# Altium PCB NewTrackerBoard.PcbDoc (part 2 of 4)
Units mm, origin at the board's own origin, x right, y up, seen from the top; angles counter-clockwise.
Board outline 47 x 47 mm, 4 copper layers (L1 (SIG), L2 (GND), L3 (GND), L4 (SIG + PWR)), stack 1.566 mm thick; 77 components, 57 nets, 308 pads, 297 vias.
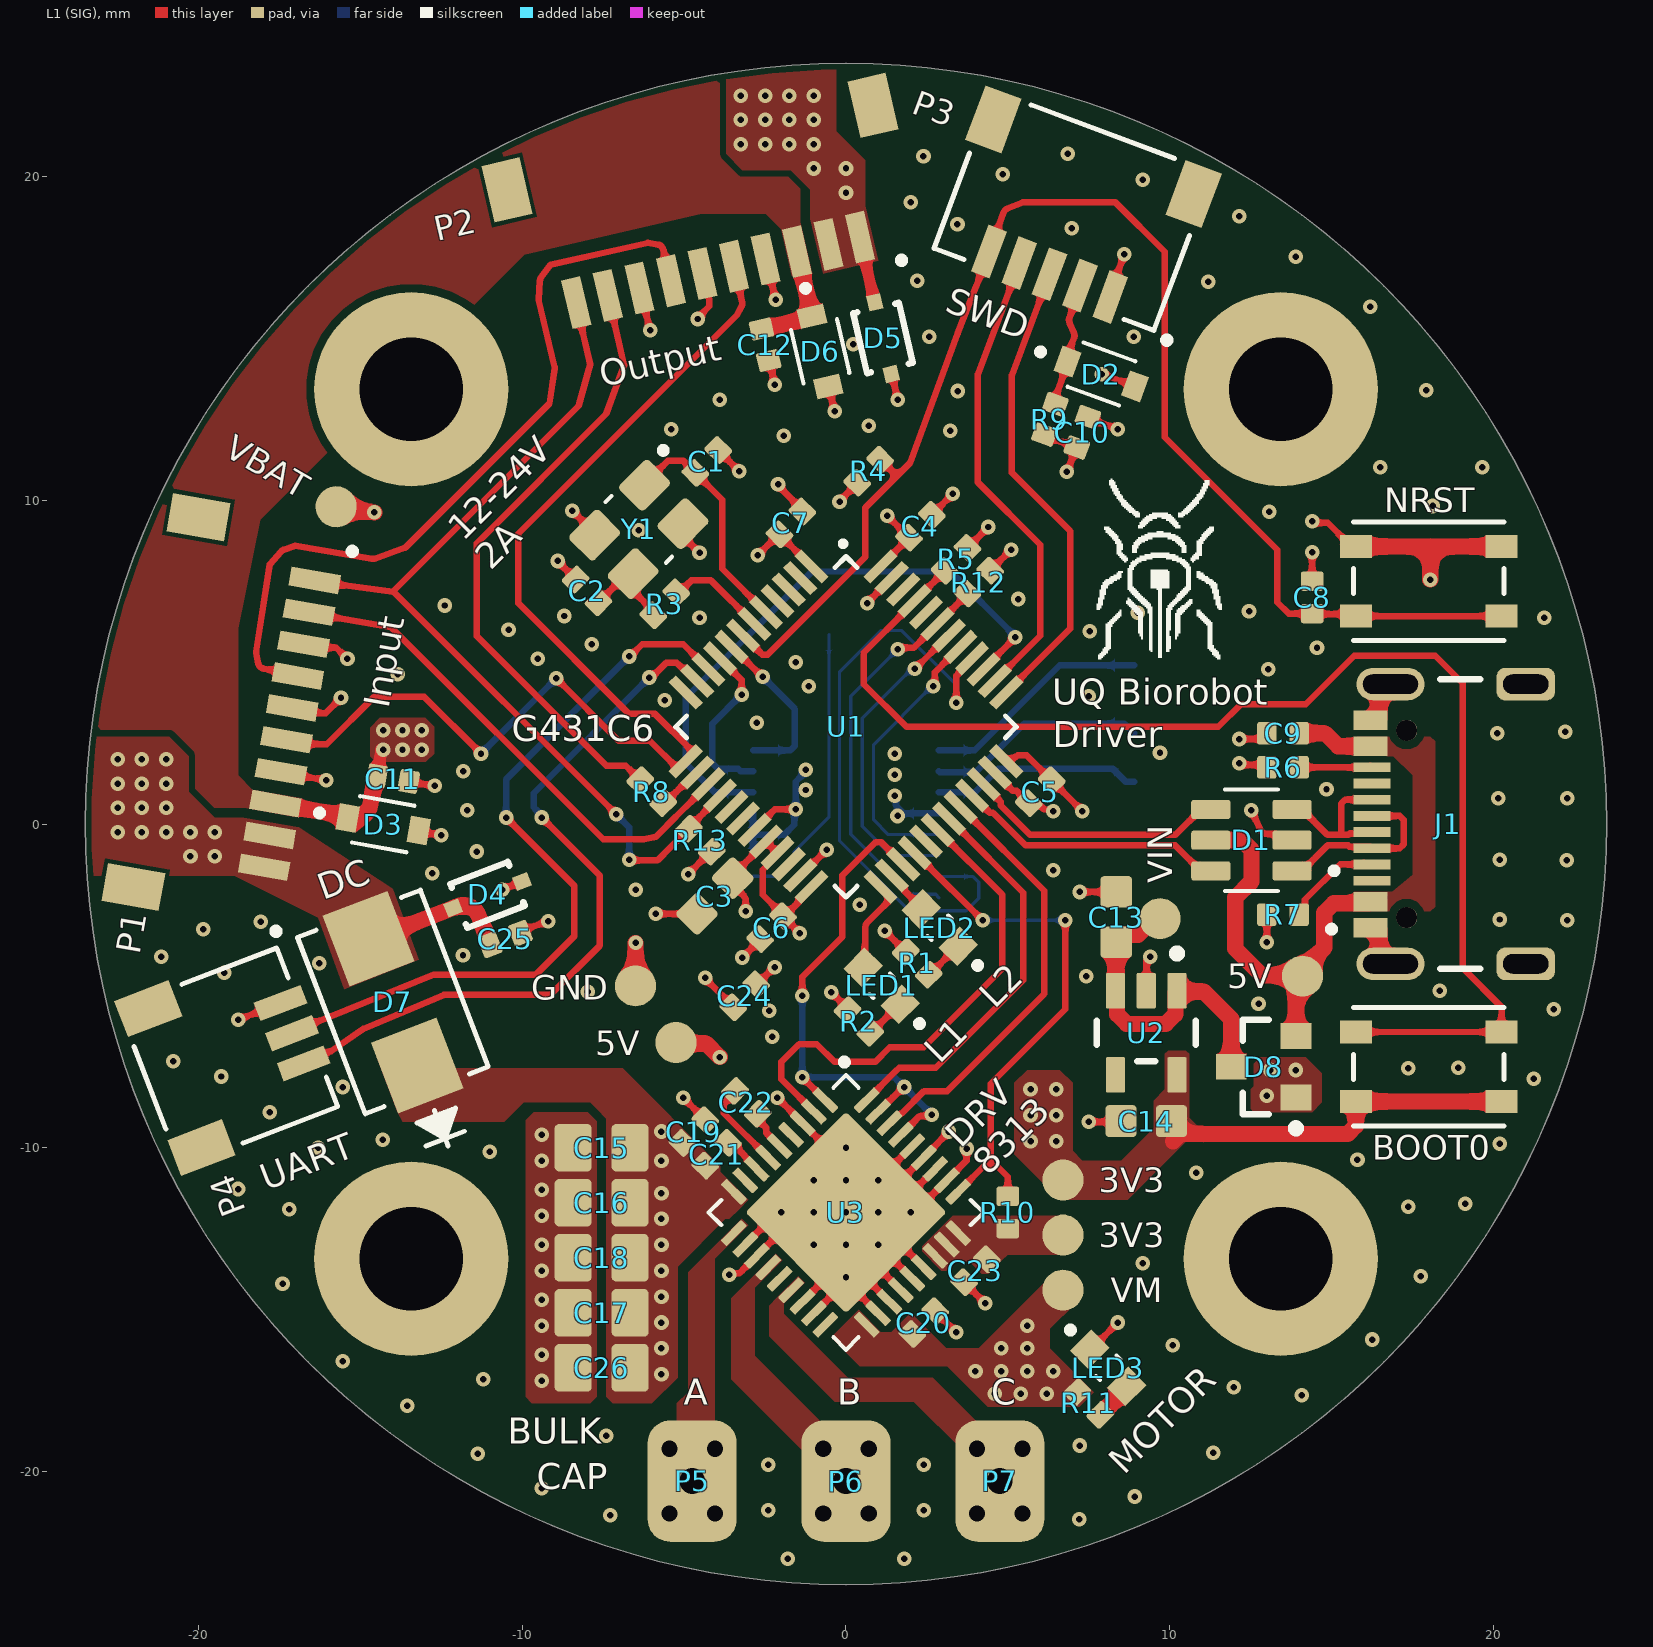
[diagram p0: L1 (SIG) view]

## Part data (continued)
D7: "Schottky diode forward voltage drop (Vf) 490mV@4A DC reverse withstand voltage (Vr) 40V", Average Rectified Current=4A, Case/Package=SMB, Forward Voltage=420mV, Manufacturer=Vishay, Max Forward Surge Current (Ifsm)=100A, Max Junction Temperature (Tj)=150°C, Max Repetitive Reverse Voltage (Vrrm)=40V, Max Reverse Leakage Current=400µA, Min Operating Temperature=-65°C, Supplier Part Number 1=SSB44-E3/52TGICT-ND, Category="Schottky Diodes", China RoHS=Non-Compliant, ComponentLink1Description=https://datasheet.octopart.com:443/SSB44-E3-52T-Vishay-datasheet-181475158.pdf?src-supplier=Newark, ComponentLink1URL=https://datasheet.octopart.com:443/SSB44-E3-52T-Vishay-datasheet-181475158.pdf?src-supplier=Newark, ComponentLink2Description=https://datasheet.octopart.com:443/SSB44-E3-52T-Vishay-datasheet-11777709.pdf?src-supplier=Newark, ComponentLink2URL=https://datasheet.octopart.com:443/SSB44-E3-52T-Vishay-datasheet-11777709.pdf?src-supplier=Newark, ComponentLink3Description=https://datasheet.octopart.com:443/SSB44-E3-52T-Vishay-datasheet-10060009.pdf?src-supplier=Newark, ComponentLink3URL=https://datasheet.octopart.com:443/SSB44-E3-52T-Vishay-datasheet-10060009.pdf?src-supplier=Newark, ComponentLink4Description=https://datasheet.octopart.com:443/SSB44-E3-52T-Vishay-datasheet-8331249.pdf?src-supplier=Newark, ComponentLink4URL=https://datasheet.octopart.com:443/SSB44-E3-52T-Vishay-datasheet-8331249.pdf?src-supplier=Newark, ComponentLink5Description=https://datasheet.octopart.com:443/SSB44-E3-52T-Vishay-datasheet-22977460.pdf?src-supplier=Newark, ComponentLink5URL=https://datasheet.octopart.com:443/SSB44-E3-52T-Vishay-datasheet-22977460.pdf?src-supplier=Newark, ComponentLink6Description=https://datasheet.octopart.com:443/SSB44-E3-52T-Vishay-datasheet-21270664.pdf?src-supplier=Newark, ComponentLink6URL=https://datasheet.octopart.com:443/SSB44-E3-52T-Vishay-datasheet-21270664.pdf?src-supplier=Newark, ComponentLink7Description=https://datasheet.octopart.com:443/SSB44-E3-52T-Vishay-datasheet-46750820.pdf?src-supplier=Upverter, ComponentLink7URL=https://datasheet.octopart.com:443/SSB44-E3-52T-Vishay-datasheet-46750820.pdf?src-supplier=Upverter, ComponentLink8Description=https://sigma.octopart.com:443/138898578/technical_drawing/Vishay-SSB44-E3-52T.pdf?src-supplier=Upverter, ComponentLink8URL=https://sigma.octopart.com:443/138898578/technical_drawing/Vishay-SSB44-E3-52T.pdf?src-supplier=Upverter, ComponentLink9Description=https://datasheet.octopart.com:443/SSB44-E3-52T-Vishay-datasheet-62319260.pdf?src-supplier=element14+APAC, ComponentLink9URL=https://datasheet.octopart.com:443/SSB44-E3-52T-Vishay-datasheet-62319260.pdf?src-supplier=element14+APAC, ComponentLink10Description=https://datasheet.octopart.com:443/SSB44-E3-52T-Vishay-datasheet-54005.pdf?src-supplier=element14+APAC, ComponentLink10URL=https://datasheet.octopart.com:443/SSB44-E3-52T-Vishay-datasheet-54005.pdf?src-supplier=element14+APAC, ComponentLink11Description=https://datasheet.octopart.com:443/SSB44-E3/52T-Vishay-datasheet-14186728.pdf?src-supplier=iiiC, ComponentLink11URL=https://datasheet.octopart.com:443/SSB44-E3/52T-Vishay-datasheet-14186728.pdf?src-supplier=iiiC, ComponentLink12Description=https://datasheet.octopart.com:443/SSB44-E3/52T-Vishay-datasheet-9732905.pdf?src-supplier=RS+(Formerly+Allied+Electronics), ComponentLink12URL=https://datasheet.octopart.com:443/SSB44-E3/52T-Vishay-datasheet-9732905.pdf?src-supplier=RS+(Formerly+Allied+Electronics), ComponentLink13Description=https://datasheet.octopart.com:443/SSB44-E3-52T-Vishay-datasheet-7601381.pdf?src-supplier=Jameco, ComponentLink13URL=https://datasheet.octopart.com:443/SSB44-E3-52T-Vishay-datasheet-7601381.pdf?src-supplier=Jameco, ComponentLink14Description=https://datasheet.octopart.com:443/SSB44-E3/52T-Vishay-datasheet-128407.pdf?src-supplier=DigiKey, ComponentLink14URL=https://datasheet.octopart.com:443/SSB44-E3/52T-Vishay-datasheet-128407.pdf?src-supplier=DigiKey, ComponentLink15Description=http://sigma.octopart.com:80/rohs_statement/Vishay-company-15.pdf?src-supplier=Compliance+Statements, ComponentLink15URL=http://sigma.octopart.com:80/rohs_statement/Vishay-company-15.pdf?src-supplier=Compliance+Statements, Contact Plating=Tin, Current Rating=4A, Element Configuration=Single, Forward Current=4A, Height=2.44mm, Lead Free="Lead Free", Length=4.5466mm, Lifecycle Status=Production, Manufacturer Package Identifier=SSB44-E3/52T, Manufacturer Part Number=SSB44-E3/52T, Max Operating Temperature=150°C, Max Output Current=4A, Max Reverse Voltage (DC)=40V, Max Surge Current=100A, Mount="Surface Mount", Number of Elements=1, Number of Pins=2, Number of Terminals=2, Output Current=4A, Packaging="Cut Tape", Peak Non-Repetitive Surge Current=100A, Peak Reverse Current=400µA, Polarity=Standard, Pricing 1="1=0.84, 10=0.52, 100=0.3353 (USD)", Radiation Hardening=No, REACH SVHC=No, Reverse Standoff Voltage=40V, RoHS=Compliant, Schedule B="8541100080, 8541100080|8541100080|8541100080|8541100080|8541100080", Stock 1=92846, Supplier 1=DigiKey, Voltage Rating (DC)=40V
D8: "BAT54CL Series 30 V 2 uA Surface Mount Schottky Barrier Diode - SOT-23", Average Rectified Current=200mA, Case/Package=SOT-23-3, Forward Voltage=240mV, Manufacturer=onsemi, Manufacturer Lifecycle Status=ACTIVE, Max Forward Surge Current (Ifsm)=600mA, Max Operating Temperature=125°C, Max Output Current=100mA, Max Power Dissipation=225mW, Max Repetitive Reverse Voltage (Vrrm)=30V, Max Reverse Leakage Current=2µA, Min Operating Temperature=-55°C, Supplier Part Number 1=BAT54CLT3GOSDKR-ND, Category="Schottky Diodes", China RoHS=Compliant, ComponentLink1Description=https://datasheet.octopart.com:443/BAT54CLT3G-onsemi-datasheet-175423440.pdf?src-supplier=IHS, ComponentLink1URL=https://datasheet.octopart.com:443/BAT54CLT3G-onsemi-datasheet-175423440.pdf?src-supplier=IHS, ComponentLink2Description=https://datasheet.octopart.com:443/BAT54CLT3G-ON-Semiconductor-datasheet-78758876.pdf?src-supplier=JRH+Electronics, ComponentLink2URL=https://datasheet.octopart.com:443/BAT54CLT3G-ON-Semiconductor-datasheet-78758876.pdf?src-supplier=JRH+Electronics, ComponentLink3Description=https://datasheet.octopart.com:443/BAT54CLT3G-ON-Semiconductor-datasheet-141916634.pdf?src-supplier=Upverter, ComponentLink3URL=https://datasheet.octopart.com:443/BAT54CLT3G-ON-Semiconductor-datasheet-141916634.pdf?src-supplier=Upverter, ComponentLink4Description=https://datasheet.octopart.com:443/BAT54CLT3G-ON-Semiconductor-datasheet-8332005.pdf?src-supplier=Future+Electronics, ComponentLink4URL=https://datasheet.octopart.com:443/BAT54CLT3G-ON-Semiconductor-datasheet-8332005.pdf?src-supplier=Future+Electronics, ComponentLink5Description=https://datasheet.octopart.com:443/BAT54CLT3G-ON-Semiconductor-datasheet-8106935.pdf?src-supplier=Future+Electronics, ComponentLink5URL=https://datasheet.octopart.com:443/BAT54CLT3G-ON-Semiconductor-datasheet-8106935.pdf?src-supplier=Future+Electronics, ComponentLink6Description=https://datasheet.octopart.com:443/BAT54CLT3G-ON-Semiconductor-datasheet-41525499.pdf?src-supplier=RS+(Formerly+Allied+Electronics), ComponentLink6URL=https://datasheet.octopart.com:443/BAT54CLT3G-ON-Semiconductor-datasheet-41525499.pdf?src-supplier=RS+(Formerly+Allied+Electronics), ComponentLink7Description=https://datasheet.octopart.com:443/BAT54CLT3G-onsemi-datasheet-189128037.pdf?src-supplier=Master+Electronics, ComponentLink7URL=https://datasheet.octopart.com:443/BAT54CLT3G-onsemi-datasheet-189128037.pdf?src-supplier=Master+Electronics, ComponentLink8Description=https://datasheet.octopart.com:443/BAT54CLT3G-ON-Semiconductor-datasheet-11629545.pdf?src-supplier=Arrow+Electronics, ComponentLink8URL=https://datasheet.octopart.com:443/BAT54CLT3G-ON-Semiconductor-datasheet-11629545.pdf?src-supplier=Arrow+Electronics, ComponentLink9Description=http://sigma.octopart.com:80/15540786/rohs_certificate/ON-Semiconductor-BAT54CLT3G.pdf?src-supplier=Compliance+Statements, ComponentLink9URL=http://sigma.octopart.com:80/15540786/rohs_certificate/ON-Semiconductor-BAT54CLT3G.pdf?src-supplier=Compliance+Statements, ComponentLink10Description=http://sigma.octopart.com:80/15674214/materials_sheet/ON-Semiconductor-BAT54CLT3G.csv?src-supplier=Compliance+Statements, ComponentLink10URL=http://sigma.octopart.com:80/15674214/materials_sheet/ON-Semiconductor-BAT54CLT3G.csv?src-supplier=Compliance+Statements, ComponentLink11Description=http://sigma.octopart.com:80/150604010/rohs_statement/ON-Semiconductor-BAT54CLT3G.pdf?src-supplier=Compliance+Statements, ComponentLink11URL=http://sigma.octopart.com:80/150604010/rohs_statement/ON-Semiconductor-BAT54CLT3G.pdf?src-supplier=Compliance+Statements, ComponentLink12Description=http://sigma.octopart.com:80/reach_statement/ON-Semiconductor-company-79.pdf?src-supplier=Compliance+Statements, ComponentLink12URL=http://sigma.octopart.com:80/reach_statement/ON-Semiconductor-company-79.pdf?src-supplier=Compliance+Statements, ComponentLink13Description=https://octopart.com:443/opatz8j6/c1?t=fWwoKikT5261mXGM0ypy0g0IGQzQcDddsSZuvbSVdmB-1nZSRZ4ggwUKqIc0QYATxiN1QNv3tc5K9gNLWSsypfRmlmmLl0CvTb6IWTPcR-jy4ZtU7iJlv7LHrjajWQE2jihf16JKVcuOV1nA2-N-excMr1_B4nLS4kXG99ZhUnnRORXzXCD22yMfTlIHVWxdWHuIGrDRLRfDN_FEl5iESrFYiOS-fWRa5LxuqDiveXSQWuYMoy0mSfHtN-TtcfG_yO7Nd7kaCwpBKZqOkFRn_ARKtZBKqK2rNXBFzcF_wkdg0CPJ3JBCCd0-fzEpMgisCGH-zXoAjZ7-YzxmcgmCGNIVYquym6vDa-BdygE&src-supplier=Compliance+Statements, ComponentLink13URL=https://octopart.com:443/opatz8j6/c1?t=fWwoKikT5261mXGM0ypy0g0IGQzQcDddsSZuvbSVdmB-1nZSRZ4ggwUKqIc0QYATxiN1QNv3tc5K9gNLWSsypfRmlmmLl0CvTb6IWTPcR-jy4ZtU7iJlv7LHrjajWQE2jihf16JKVcuOV1nA2-N-excMr1_B4nLS4kXG99ZhUnnRORXzXCD22yMfTlIHVWxdWHuIGrDRLRfDN_FEl5iESrFYiOS-fWRa5LxuqDiveXSQWuYMoy0mSfHtN-TtcfG_yO7Nd7kaCwpBKZqOkFRn_ARKtZBKqK2rNXBFzcF_wkdg0CPJ3JBCCd0-fzEpMgisCGH-zXoAjZ7-YzxmcgmCGNIVYquym6vDa-BdygE&src-supplier=Compliance+Statements, ComponentLink14Description=https://octopart.com:443/opatz8j6/c1?t=B_1W9NDPKiVW9_xeBhSjXW6qpRFQt1GubKuBeL6C7KMWiDqOWuxbkOIcp9dqtX3Yq8--5XW88lfGBVA7HmD66DFyQvDNcrrPjWXZiG4711EOeHHnHpPqwc95_S4fQme7yE9n3sYxdAQvxBXSm4yRVJ71c-OpzKpAJ6ywCVT0a0sKLuIcOVcaIgD61fZtF_LS1kcCDjRxNYrL9WJZcGi5NptJxef-JqYkGUKDfcFHMGi1KZqXCgPZbgxa-Fw5LZxpHp3-6aQwXylQzVvUqX6mobR1Vl3H8PpiMaQjr6OwzEQ9egeKJpLqUcsu08VRy-SY_uHfFQyy3GilZ_cbGYiHirfBU5Mi5EnID-Ym-OKf&src-supplier=Compliance+Statements, ComponentLink14URL=https://octopart.com:443/opatz8j6/c1?t=B_1W9NDPKiVW9_xeBhSjXW6qpRFQt1GubKuBeL6C7KMWiDqOWuxbkOIcp9dqtX3Yq8--5XW88lfGBVA7HmD66DFyQvDNcrrPjWXZiG4711EOeHHnHpPqwc95_S4fQme7yE9n3sYxdAQvxBXSm4yRVJ71c-OpzKpAJ6ywCVT0a0sKLuIcOVcaIgD61fZtF_LS1kcCDjRxNYrL9WJZcGi5NptJxef-JqYkGUKDfcFHMGi1KZqXCgPZbgxa-Fw5LZxpHp3-6aQwXylQzVvUqX6mobR1Vl3H8PpiMaQjr6OwzEQ9egeKJpLqUcsu08VRy-SY_uHfFQyy3GilZ_cbGYiHirfBU5Mi5EnID-Ym-OKf&src-supplier=Compliance+Statements, Contact Plating=Tin, Element Configuration="Common Cathode", Forward Current=200mA, Halogen Free="Halogen Free", Height=1.01mm, Lead Free="Lead Free", Length=3.04mm, Lifecycle Status=Production, Manufacturer Part Number=BAT54CLT3G, Max Reverse Voltage (DC)=30V, Max Surge Current=600mA, Number of Elements=2, Number of Pins=3, Number of Terminals=3, Packaging="Tape and Reel", Peak Non-Repetitive Surge Current=600mA, Pricing 1="1=0.13, 10=0.081, 100=0.0499, 500=0.036, 1000=0.03147, 2000=0.02764, 5000=0.02347 (USD)", Radiation Hardening=No, REACH SVHC=Yes, Recovery Time=5ns, Reverse Recovery Time=5ns, RoHS=Compliant, Schedule B="8541100070, 8541100070|8541100070|8541100070|8541100070|8541100070", Stock 1=167313, Supplier 1=DigiKey, Width=1.4mm
J1: library part USB4105-GF-A-060, "USB-C (USB TYPE-C) USB 2.0 Receptacle Connector 24 (16+8 Dummy) Position Surface Mount, Right Angle; Through Hole", Package=None, Check_prices=https://www.snapeda.com/parts/USB4105GFA060/Global+Connector+Technology/view-part/?ref=eda, MF="Global Connector Technology", MP=USB4105GFA060, SnapEDA_Link=https://www.snapeda.com/parts/USB4105GFA060/Global+Connector+Technology/view-part/?ref=snap
LED1 LED2 LED3: library part LTST-C190KGKT, "LED yellow green 0603 wavelength 567.5nm~576.5nm light intensity 18mcd~71mcd Front Mounting", Case Code (Imperial)=0603, Case Code (Metric)=1608, Color=Green, Forward Current=30mA, Forward Voltage=2.15V, Lens Color="Clear, Colorless", Manufacturer="Diodes Inc.", Max Operating Temperature=85°C, Min Operating Temperature=-30°C, Power Dissipation=75mW, Reverse Voltage=5V, Test Current=20mA, Case/Package=0603, Category=LEDs, China RoHS=Compliant, ComponentLink1Description=https://datasheet.octopart.com:443/LTST-C190KGKT-Lite-On-datasheet-86397316.pdf?src-supplier=ODG+(Origin+Data+Global), ComponentLink1URL=https://datasheet.octopart.com:443/LTST-C190KGKT-Lite-On-datasheet-86397316.pdf?src-supplier=ODG+(Origin+Data+Global), ComponentLink2Description=https://datasheet.octopart.com:443/LTST-C190KGKT-Lite-On-datasheet-180605179.pdf?src-supplier=IHS, ComponentLink2URL=https://datasheet.octopart.com:443/LTST-C190KGKT-Lite-On-datasheet-180605179.pdf?src-supplier=IHS, ComponentLink3Description=https://datasheet.octopart.com:443/LTST-C190KGKT-Lite-On-datasheet-13693967.pdf?src-supplier=Factory+Futures, ComponentLink3URL=https://datasheet.octopart.com:443/LTST-C190KGKT-Lite-On-datasheet-13693967.pdf?src-supplier=Factory+Futures, ComponentLink4Description=https://datasheet.octopart.com:443/LTST-C190KGKT-Lite-On-datasheet-165573809.pdf?src-supplier=TME, ComponentLink4URL=https://datasheet.octopart.com:443/LTST-C190KGKT-Lite-On-datasheet-165573809.pdf?src-supplier=TME, ComponentLink5Description=https://datasheet.octopart.com:443/LTST-C190KGKT-Lite-On-datasheet-165573808.pdf?src-supplier=TME, ComponentLink5URL=https://datasheet.octopart.com:443/LTST-C190KGKT-Lite-On-datasheet-165573808.pdf?src-supplier=TME, ComponentLink6Description=https://datasheet.octopart.com:443/LTST-C190KGKT-Lite-On-datasheet-43775815.pdf?src-supplier=TME, ComponentLink6URL=https://datasheet.octopart.com:443/LTST-C190KGKT-Lite-On-datasheet-43775815.pdf?src-supplier=TME, ComponentLink7Description=https://datasheet.octopart.com:443/LTST-C190KGKT-Lite-On-datasheet-32046999.pdf?src-supplier=Future+Electronics, ComponentLink7URL=https://datasheet.octopart.com:443/LTST-C190KGKT-Lite-On-datasheet-32046999.pdf?src-supplier=Future+Electronics, ComponentLink8Description=https://datasheet.octopart.com:443/LTST-C190KGKT-Lite-On-datasheet-8326678.pdf?src-supplier=Future+Electronics, ComponentLink8URL=https://datasheet.octopart.com:443/LTST-C190KGKT-Lite-On-datasheet-8326678.pdf?src-supplier=Future+Electronics, ComponentLink9Description=https://datasheet.octopart.com:443/LTST-C190KGKT-Lite-On-datasheet-78838574.pdf?src-supplier=Future+Electronics, ComponentLink9URL=https://datasheet.octopart.com:443/LTST-C190KGKT-Lite-On-datasheet-78838574.pdf?src-supplier=Future+Electronics, ComponentLink10Description=https://datasheet.octopart.com:443/LTST-C190KGKT-Lite-On-datasheet-158288.pdf?src-supplier=Mouser, ComponentLink10URL=https://datasheet.octopart.com:443/LTST-C190KGKT-Lite-On-datasheet-158288.pdf?src-supplier=Mouser, ComponentLink11Description=https://datasheet.octopart.com:443/LTST-C190KGKT-Lite-On-datasheet-49281.pdf?src-supplier=DigiKey, ComponentLink11URL=https://datasheet.octopart.com:443/LTST-C190KGKT-Lite-On-datasheet-49281.pdf?src-supplier=DigiKey, ComponentLink12Description=https://datasheet.octopart.com:443/LTST-C190KGKT-Lite-On-datasheet-14174998.pdf?src-supplier=iiiC, ComponentLink12URL=https://datasheet.octopart.com:443/LTST-C190KGKT-Lite-On-datasheet-14174998.pdf?src-supplier=iiiC, Depth=800µm, Dominant Wavelength=571nm, Height=800µm, Illumination Color=Green, Lead Free="Lead Free", Length=1.6mm, Lens Style=Clear, Lens Transparency=Clear, Lifecycle Status=Production, Luminous Intensity=35mcd, Manufacturer Part Number=LTST-C190KGKT, Mount="Surface Mount", Number of Circuits=1, Number of Elements=1, Number of LEDs=1, Number of Pins=2, Number of Terminals=2, Peak Wavelength=574nm, Power Rating=75mW, Pricing 1="1=0.13, 10=0.088, 100=0.0603, 500=0.04758, 1000=0.04332, 2000=0.03968 (USD)", Radiation Hardening=No, REACH SVHC=Yes, RoHS=Compliant, Schedule B="8541402000, 8541402000|8541402000|8541402000|8541402000|8541402000|8541402000|8541402000|8541402000|8541402000|8541402000|8541402000|8541402000|8541402000|8541402000|8541402000|8541402000|8541402000|8541402000|8541402000|8541402000|8541402000|8541402000|8541402000|85", Shape=Rectangular, Stock 1=2033232, Supplier 1=DigiKey, Terminal Pitch=1.5mm, Viewing Angle=130°, Wavelength=574nm, Width=800µm
MT6835: "SPI TSSOP-16 Angle, Linear Position Measuring RoHS", Current - Supply=22mA, Manufacturer="Magn Tek", Operating Temperature=-40℃~+125℃, Package=TSSOP-16, Supplier Part Number=C2932578, Voltage - Supply=3V~5.5V, Category=Sensors, Features="Angle nonlinearity compensation;Self-calibration;Zero position programming;Fault diagnosis", Interface=SPI, Manufacturer Part Number=MT6835GT-STD, Supplier 1=LCSC
NRST: "Switch Tactile N.O. SPST Button J-Bend 0.05A 16V 150000Cycles 1.569N SMD T/R", Case/Package=SMD/SMT, Color=Black, Contact Current Rating=50mA, Contact Resistance=500mΩ, Insulation Resistance=100MΩ, Manufacturer="C&K Components", Max Operating Temperature=85°C, Max Voltage Rating (DC)=16V, Min Operating Temperature=-40°C, Operating Force=1.57N, Actuator Length=711.2µm, Category="Tactile Switches", ComponentLink1Description=https://datasheet.octopart.com:443/PTS810SJM250SMTRLFS-C%26K-Components-datasheet-180017475.pdf?src-supplier=IHS, ComponentLink1URL=https://datasheet.octopart.com:443/PTS810SJM250SMTRLFS-C%26K-Components-datasheet-180017475.pdf?src-supplier=IHS, ComponentLink2Description=https://datasheet.octopart.com:443/PTS810SJM250SMTRLFS-C%26K-Components-datasheet-67873722.pdf?src-supplier=Upverter, ComponentLink2URL=https://datasheet.octopart.com:443/PTS810SJM250SMTRLFS-C%26K-Components-datasheet-67873722.pdf?src-supplier=Upverter, ComponentLink3Description=https://datasheet.octopart.com:443/PTS810-SJM-250-SMTR-LFS-C%26K-Components-datasheet-41562126.pdf?src-supplier=Upverter, ComponentLink3URL=https://datasheet.octopart.com:443/PTS810-SJM-250-SMTR-LFS-C%26K-Components-datasheet-41562126.pdf?src-supplier=Upverter, ComponentLink4Description=https://datasheet.octopart.com:443/PTS810SJM250SMTR-LFS-C%26K-Components-datasheet-181955281.pdf?src-supplier=Farnell, ComponentLink4URL=https://datasheet.octopart.com:443/PTS810SJM250SMTR-LFS-C%26K-Components-datasheet-181955281.pdf?src-supplier=Farnell, ComponentLink5Description=https://datasheet.octopart.com:443/PTS810SJM250SMTRLFS-C%26K-Components-datasheet-134606748.pdf?src-supplier=TME, ComponentLink5URL=https://datasheet.octopart.com:443/PTS810SJM250SMTRLFS-C%26K-Components-datasheet-134606748.pdf?src-supplier=TME, ComponentLink6Description=https://datasheet.octopart.com:443/PTS810-SJM-250-SMTR-LFS-C%26K-Components-datasheet-151508687.pdf?src-supplier=TME, ComponentLink6URL=https://datasheet.octopart.com:443/PTS810-SJM-250-SMTR-LFS-C%26K-Components-datasheet-151508687.pdf?src-supplier=TME, ComponentLink7Description=http://sigma.octopart.com:80/reach_statement/ITT-company-18.pdf?src-supplier=Compliance+Statements, ComponentLink7URL=http://sigma.octopart.com:80/reach_statement/ITT-company-18.pdf?src-supplier=Compliance+Statements, Contact Plating=Silver, Country of Origin="Mainland China", Current Rating=50mA, Depth=4.6mm, Electrical Life=150kcycles, Export Control Classification Number (ECCN) Code=EAR99, Harmonized Tariff Schedule (HTS) Code=8536.50.90.40, Height=1.8mm, Illumination Type=Non-Illuminated, Introduction Date=2013-03-04, Lead Free="Lead Free", Length=4.2mm, Life (Cycles)=150kcycles, Lifecycle Status=Production, Manufacturer Package Identifier=PTS810SJM250SMTRLFS, Manufacturer Part Number=PTS810SJM250SMTRLFS, Max Current Rating=50mA, Mechanical Life=150kcycles, Mount="Surface Mount", Number of Pins=4, Number of Positions=1, Orientation=Straight, Pricing 1="1=0.58, 10=0.501, 25=0.4672, 100=0.4173, 250=0.38652, 500=0.36488, 1000=0.34488 (USD)", REACH SVHC=Yes, RoHS=Compliant, Stock 1=70955, Supplier 1=DigiKey, Switch Function=Off-Mom, Switch Travel=150µm, Termination=Solder, Throw Configuration=SPST, Voltage Rating (DC)=16V
P1: library part SM10B-SRSS-TB_1, "Board Connector, 10 Contact(s), 1 Row(s), Male, Right Angle, Surface Mount Terminal", Color=Natural, Manufacturer=JST, Category="Card Edge Connectors", ComponentLink1Description=https://datasheet.octopart.com:443/SM10B-SRSS-TB-JST-datasheet-180492086.pdf?src-supplier=IHS, ComponentLink1URL=https://datasheet.octopart.com:443/SM10B-SRSS-TB-JST-datasheet-180492086.pdf?src-supplier=IHS, ComponentLink2Description=https://datasheet.octopart.com:443/SM10B-SRSS-TB-JST-datasheet-118603.pdf?src-supplier=DigiKey, ComponentLink2URL=https://datasheet.octopart.com:443/SM10B-SRSS-TB-JST-datasheet-118603.pdf?src-supplier=DigiKey, Connector Type="Male Pin", Contact Plating=Tin, Export Control Classification Number (ECCN) Code=EAR99, Gender=Male, Harmonized Tariff Schedule (HTS) Code=8536.69.40.40, Housing Color=Natural, Housing Material=Nylon, Introduction Date=1996-04-01, Lead Free="Contains Lead", Lifecycle Status=Obsolete, Manufacturer Part Number=SM10B-SRSS-TB, Mount="Surface Mount", Number of Contacts=10, Number of Pins=10, Number of Positions=10, Number of Rows=1, Orientation="Right Angle", Pitch=990.6µm, Pricing 1="1=0.93, 10=0.788, 100=0.6694, 500=0.59746, 1000=0.56894 (USD)", RoHS=Compliant, Stock 1=3469, Supplier 1=DigiKey, Terminal Pitch=1mm, Termination=Solder
P2: library part SM10B-SRSS-TB_2, "Board Connector, 10 Contact(s), 1 Row(s), Male, Right Angle, Surface Mount Terminal", Color=Natural, Manufacturer=JST, Category="Card Edge Connectors", ComponentLink1Description=https://datasheet.octopart.com:443/SM10B-SRSS-TB-JST-datasheet-180492086.pdf?src-supplier=IHS, ComponentLink1URL=https://datasheet.octopart.com:443/SM10B-SRSS-TB-JST-datasheet-180492086.pdf?src-supplier=IHS, ComponentLink2Description=https://datasheet.octopart.com:443/SM10B-SRSS-TB-JST-datasheet-118603.pdf?src-supplier=DigiKey, ComponentLink2URL=https://datasheet.octopart.com:443/SM10B-SRSS-TB-JST-datasheet-118603.pdf?src-supplier=DigiKey, Connector Type="Male Pin", Contact Plating=Tin, Export Control Classification Number (ECCN) Code=EAR99, Gender=Male, Harmonized Tariff Schedule (HTS) Code=8536.69.40.40, Housing Color=Natural, Housing Material=Nylon, Introduction Date=1996-04-01, Lead Free="Contains Lead", Lifecycle Status=Obsolete, Manufacturer Part Number=SM10B-SRSS-TB, Mount="Surface Mount", Number of Contacts=10, Number of Pins=10, Number of Positions=10, Number of Rows=1, Orientation="Right Angle", Pitch=990.6µm, Pricing 1="1=0.93, 10=0.788, 100=0.6694, 500=0.59746, 1000=0.56894 (USD)", RoHS=Compliant, Stock 1=3469, Supplier 1=DigiKey, Terminal Pitch=1mm, Termination=Solder
P3: library part SM05B-SRSS-TB-SWD, "Board Connector, 5 Contact(s), 1 Row(s), Male, Right Angle, Surface Mount Terminal", Color=Natural, Manufacturer=JST, Category="Card Edge Connectors", ComponentLink1Description=https://datasheet.octopart.com:443/SM05B-SRSS-TB-JST-datasheet-180492086.pdf?src-supplier=IHS, ComponentLink1URL=https://datasheet.octopart.com:443/SM05B-SRSS-TB-JST-datasheet-180492086.pdf?src-supplier=IHS, ComponentLink2Description=https://datasheet.octopart.com:443/SM05B-SRSS-TB-JST-datasheet-118603.pdf?src-supplier=DigiKey, ComponentLink2URL=https://datasheet.octopart.com:443/SM05B-SRSS-TB-JST-datasheet-118603.pdf?src-supplier=DigiKey, ComponentLink3Description=https://datasheet.octopart.com:443/SM05B-SRSS-TB-JST-datasheet-152738602.pdf?src-supplier=Amar+Radio+Corporation, ComponentLink3URL=https://datasheet.octopart.com:443/SM05B-SRSS-TB-JST-datasheet-152738602.pdf?src-supplier=Amar+Radio+Corporation, Connector Type="Male Pin", Contact Plating=Tin, Export Control Classification Number (ECCN) Code=EAR99, Gender=Male, Harmonized Tariff Schedule (HTS) Code=8536.69.40.40, Housing Color=Natural, Housing Material=Nylon, Introduction Date=1996-04-01, Lead Free="Contains Lead", Lifecycle Status=Obsolete, Manufacturer Part Number=SM05B-SRSS-TB, Mount="Surface Mount", Number of Contacts=5, Number of Positions=5, Number of Rows=1, Orientation="Right Angle", Pitch=990.6µm, Pricing 1="1=0.62, 10=0.527, 100=0.4477, 500=0.3996, 1000=0.38051 (USD)", RoHS=Compliant, Stock 1=42194, Supplier 1=DigiKey, Terminal Pitch=1mm, Termination=Solder
P4: library part SM03B-SRSS-TB_UART, "Board Connector, 3 Contact(s), 1 Row(s), Male, Right Angle, Surface Mount Terminal", Color=Natural, Manufacturer=JST, Max Operating Temperature=85°C, Min Operating Temperature=-25°C, Category="Card Edge Connectors", ComponentLink1Description=https://datasheet.octopart.com:443/SM03B-SRSS-TB-JST-datasheet-180492086.pdf?src-supplier=IHS, ComponentLink1URL=https://datasheet.octopart.com:443/SM03B-SRSS-TB-JST-datasheet-180492086.pdf?src-supplier=IHS, ComponentLink2Description=https://datasheet.octopart.com:443/SM03B-SRSS-TB-JST-datasheet-44103209.pdf?src-supplier=TME, ComponentLink2URL=https://datasheet.octopart.com:443/SM03B-SRSS-TB-JST-datasheet-44103209.pdf?src-supplier=TME, ComponentLink3Description=https://datasheet.octopart.com:443/SM03B-SRSS-TB-JST-datasheet-118603.pdf?src-supplier=DigiKey, ComponentLink3URL=https://datasheet.octopart.com:443/SM03B-SRSS-TB-JST-datasheet-118603.pdf?src-supplier=DigiKey, ComponentLink4Description=https://datasheet.octopart.com:443/SM03B-SRSS-TB-JST-datasheet-152738602.pdf?src-supplier=Amar+Radio+Corporation, ComponentLink4URL=https://datasheet.octopart.com:443/SM03B-SRSS-TB-JST-datasheet-152738602.pdf?src-supplier=Amar+Radio+Corporation, Connector Type="Male Pin", Contact Gender=Male, Contact Plating=Tin, Housing Color=Natural, Housing Material=Nylon, Lead Free="Contains Lead", Lifecycle Status=Obsolete, Manufacturer Part Number=SM03B-SRSS-TB, Mount="Surface Mount", Number of Contacts=3, Number of Pins=3, Number of Positions=3, Number of Rows=1, Orientation=Horizontal, Pitch=990.6µm, Pricing 1="1=0.44, 10=0.373, 100=0.317, 500=0.2829, 1000=0.26938 (USD)", RoHS=Compliant, Stock 1=14167, Supplier 1=DigiKey, Terminal Pitch=1mm, Termination=Solder
P5 P6 P7: "Plated Through Hole 3x2.5mm SOLDER_PAD"
R1 R2: library part RCS0402300RFKED, "300Ω RCS e3 0402 0402 (1005Metric) Chip Resistor ±1% ±100ppm/C 300Ohms 0.2W 1/5W", Case/Package=0402, Manufacturer=Vishay, Max Operating Temperature=155°C, Max Power Dissipation=200mW, Min Operating Temperature=-55°C, Ratings=AEC-Q200, Resistance=300Ω, Temperature Coefficient=100ppm/°C, Tolerance=±1%, Working Voltage=50V, Category="Chip SMD Resistors", China RoHS=Non-Compliant, ComponentLink1Description=https://datasheet.octopart.com:443/RCS0402300RFKED-Vishay-datasheet-176436275.pdf?src-supplier=IHS, ComponentLink1URL=https://datasheet.octopart.com:443/RCS0402300RFKED-Vishay-datasheet-176436275.pdf?src-supplier=IHS, ComponentLink2Description=http://sigma.octopart.com:80/rohs_statement/Vishay-company-15.pdf?src-supplier=Compliance+Statements, ComponentLink2URL=http://sigma.octopart.com:80/rohs_statement/Vishay-company-15.pdf?src-supplier=Compliance+Statements, Composition="Thick Film", Country of Origin="Israel, Mainland China", Export Control Classification Number (ECCN) Code=EAR99, Features="Automotive AEC-Q200", Harmonized Tariff Schedule (HTS) Code=8533.21.00.30, Height=350µm, Introduction Date=2016-07-12, Length=1mm, Lifecycle Status=Production, Manufacturer Part Number=RCS0402300RFKED, Mount="Surface Mount", Number of Terminals=2, Number of Terminations=2, Power Rating=200mW, Pricing 1="1=0.13, 10=0.06, 25=0.0464, 50=0.0386, 100=0.0325, 250=0.0264, 500=0.02292, 1000=0.02015, 5000=0.01575 (USD)", REACH SVHC=Yes, RoHS=Compliant, Stock 1=8281, Supplier 1=DigiKey, Width=500µm
R3 R8 R9: library part RCS04020000Z0ED, "0Ω Resistor, Jumper, 0402 [1005 Metric], Thick Film, 200 mW, 3 A, Surface Mount Device", Case Code (Imperial)=0402, Case Code (Metric)=1005, Manufacturer=Vishay, Max Current Rating=3A, Max Operating Temperature=155°C, Max Power Dissipation=200mW, Min Operating Temperature=-55°C, Ratings=AEC-Q200, Resistance=0Ω, Supplier Part Number 1=541-2877-6-ND, Tolerance=±5%, Voltage Rating=50V, Case/Package=0402, Category="Chip SMD Resistors", China RoHS=Non-Compliant, ComponentLink1Description=https://datasheet.octopart.com:443/RCS04020000Z0ED-Vishay-datasheet-176436275.pdf?src-supplier=IHS, ComponentLink1URL=https://datasheet.octopart.com:443/RCS04020000Z0ED-Vishay-datasheet-176436275.pdf?src-supplier=IHS, ComponentLink2Description=https://datasheet.octopart.com:443/RCS04020000Z0ED-Vishay-datasheet-86813749.pdf?src-supplier=Future+Electronics, ComponentLink2URL=https://datasheet.octopart.com:443/RCS04020000Z0ED-Vishay-datasheet-86813749.pdf?src-supplier=Future+Electronics, ComponentLink3Description=http://sigma.octopart.com:80/rohs_statement/Vishay-company-15.pdf?src-supplier=Compliance+Statements, ComponentLink3URL=http://sigma.octopart.com:80/rohs_statement/Vishay-company-15.pdf?src-supplier=Compliance+Statements, Composition="Thick Film", Country of Origin="Israel, Mainland China", Export Control Classification Number (ECCN) Code=EAR99, Features="Automotive AEC-Q200", Harmonized Tariff Schedule (HTS) Code=8533.21.00.30, Height=350µm, Introduction Date=2016-07-12, Length=1mm, Lifecycle Status=Production, Manufacturer Part Number=RCS04020000Z0ED, Mount="Surface Mount", Number of Terminals=2, Number of Terminations=2, Power Rating=200mW, Pricing 1="1=0.1, 10=0.032, 25=0.0268, 50=0.0232, 100=0.0204, 250=0.01728, 500=0.01532, 1000=0.01364, 5000=0.01064 (USD)", REACH SVHC=Yes, RoHS=Compliant, Stock 1=775160, Supplier 1=DigiKey, Voltage Rating (DC)=50V, Width=500µm
R4 R5 R10 R11 R12 R13: library part CRCW040210K0FKEDHP, "10kΩ Res Thick Film 0402 10K Ohm 1% 0.2W ±100ppm/°C Molded SMD SMD Paper T/R", Case Code (Imperial)=0402, Case Code (Metric)=1005, Manufacturer=Vishay, Manufacturer Package Identifier=CRCW0402-HPe3, Max Operating Temperature=155°C, Min Operating Temperature=-55°C, Power Rating=200mW, Ratings=AEC-Q200, Resistance=10kΩ, Supplier Part Number 1=541-10.0KYDKR-ND, Temperature Coefficient=100ppm/°C, Tolerance=±1%, Voltage Rating=50V, Category="Chip SMD Resistors", China RoHS=Non-Compliant, ComponentLink1Description=https://datasheet.octopart.com/CRCW040210K0FKEDHP-Vishay-datasheet-83567917.pdf, ComponentLink1URL=https://datasheet.octopart.com/CRCW040210K0FKEDHP-Vishay-datasheet-83567917.pdf, ComponentLink2Description=https://datasheet.octopart.com:443/CRCW040210K0FKEDHP-Vishay-datasheet-13148866.pdf?src-supplier=Newark, ComponentLink2URL=https://datasheet.octopart.com:443/CRCW040210K0FKEDHP-Vishay-datasheet-13148866.pdf?src-supplier=Newark, ComponentLink3Description=https://datasheet.octopart.com:443/CRCW040210K0FKEDHP-Vishay-datasheet-13131392.pdf?src-supplier=Newark, ComponentLink3URL=https://datasheet.octopart.com:443/CRCW040210K0FKEDHP-Vishay-datasheet-13131392.pdf?src-supplier=Newark, ComponentLink4Description=https://datasheet.octopart.com:443/CRCW040210K0FKEDHP-Vishay-datasheet-12593106.pdf?src-supplier=Newark, ComponentLink4URL=https://datasheet.octopart.com:443/CRCW040210K0FKEDHP-Vishay-datasheet-12593106.pdf?src-supplier=Newark, ComponentLink5Description=https://datasheet.octopart.com:443/CRCW040210K0FKEDHP-Vishay-datasheet-12544674.pdf?src-supplier=Newark, ComponentLink5URL=https://datasheet.octopart.com:443/CRCW040210K0FKEDHP-Vishay-datasheet-12544674.pdf?src-supplier=Newark, ComponentLink6Description=https://datasheet.octopart.com:443/CRCW040210K0FKEDHP-Vishay-datasheet-12531795.pdf?src-supplier=Newark, ComponentLink6URL=https://datasheet.octopart.com:443/CRCW040210K0FKEDHP-Vishay-datasheet-12531795.pdf?src-supplier=Newark, ComponentLink7Description=https://datasheet.octopart.com:443/CRCW040210K0FKEDHP-Vishay-datasheet-12518686.pdf?src-supplier=Newark, ComponentLink7URL=https://datasheet.octopart.com:443/CRCW040210K0FKEDHP-Vishay-datasheet-12518686.pdf?src-supplier=Newark, ComponentLink8Description=https://datasheet.octopart.com:443/CRCW040210K0FKEDHP-Vishay-datasheet-12509906.pdf?src-supplier=Newark, ComponentLink8URL=https://datasheet.octopart.com:443/CRCW040210K0FKEDHP-Vishay-datasheet-12509906.pdf?src-supplier=Newark, ComponentLink9Description=https://datasheet.octopart.com:443/CRCW040210K0FKEDHP-Vishay-datasheet-10669844.pdf?src-supplier=Newark, ComponentLink9URL=https://datasheet.octopart.com:443/CRCW040210K0FKEDHP-Vishay-datasheet-10669844.pdf?src-supplier=Newark, ComponentLink10Description=https://datasheet.octopart.com:443/CRCW040210K0FKEDHP-Vishay-datasheet-8703221.pdf?src-supplier=Newark, ComponentLink10URL=https://datasheet.octopart.com:443/CRCW040210K0FKEDHP-Vishay-datasheet-8703221.pdf?src-supplier=Newark, ComponentLink11Description=https://datasheet.octopart.com:443/CRCW040210K0FKEDHP.-Vishay-datasheet-78776210.pdf?src-supplier=Newark, ComponentLink11URL=https://datasheet.octopart.com:443/CRCW040210K0FKEDHP.-Vishay-datasheet-78776210.pdf?src-supplier=Newark, ComponentLink12Description=https://datasheet.octopart.com:443/CRCW040210K0FKEDHP-Vishay-datasheet-21268118.pdf?src-supplier=Newark, ComponentLink12URL=https://datasheet.octopart.com:443/CRCW040210K0FKEDHP-Vishay-datasheet-21268118.pdf?src-supplier=Newark, ComponentLink13Description=https://datasheet.octopart.com:443/CRCW040210K0FKEDHP-Vishay-datasheet-21226360.pdf?src-supplier=Newark, ComponentLink13URL=https://datasheet.octopart.com:443/CRCW040210K0FKEDHP-Vishay-datasheet-21226360.pdf?src-supplier=Newark, ComponentLink14Description=https://datasheet.octopart.com:443/CRCW040210K0FKEDHP-Vishay-Draloric-datasheet-8359436.pdf?src-supplier=Newark, ComponentLink14URL=https://datasheet.octopart.com:443/CRCW040210K0FKEDHP-Vishay-Draloric-datasheet-8359436.pdf?src-supplier=Newark, ComponentLink15Description=https://datasheet.octopart.com:443/CRCW040210K0FKEDHP-Vishay-datasheet-87136057.pdf?src-supplier=Farnell, ComponentLink15URL=https://datasheet.octopart.com:443/CRCW040210K0FKEDHP-Vishay-datasheet-87136057.pdf?src-supplier=Farnell, ComponentLink16Description=https://datasheet.octopart.com:443/CRCW040210K0FKEDHP-Vishay-datasheet-37143532.pdf?src-supplier=Farnell, ComponentLink16URL=https://datasheet.octopart.com:443/CRCW040210K0FKEDHP-Vishay-datasheet-37143532.pdf?src-supplier=Farnell, ComponentLink17Description=https://datasheet.octopart.com:443/CRCW040210K0FKEDHP-Vishay-datasheet-41195455.pdf?src-supplier=Farnell, ComponentLink17URL=https://datasheet.octopart.com:443/CRCW040210K0FKEDHP-Vishay-datasheet-41195455.pdf?src-supplier=Farnell, ComponentLink18Description=https://datasheet.octopart.com:443/CRCW040210K0FKEDHP.-Vishay-datasheet-66581887.pdf?src-supplier=Farnell, ComponentLink18URL=https://datasheet.octopart.com:443/CRCW040210K0FKEDHP.-Vishay-datasheet-66581887.pdf?src-supplier=Farnell, ComponentLink19Description=https://datasheet.octopart.com:443/CRCW040210K0FKEDHP-Vishay-datasheet-62317933.pdf?src-supplier=element14+APAC, ComponentLink19URL=https://datasheet.octopart.com:443/CRCW040210K0FKEDHP-Vishay-datasheet-62317933.pdf?src-supplier=element14+APAC, ComponentLink20Description=https://datasheet.octopart.com:443/CRCW040210K0FKEDHP-Vishay-Dale-datasheet-41169523.pdf?src-supplier=element14+APAC, ComponentLink20URL=https://datasheet.octopart.com:443/CRCW040210K0FKEDHP-Vishay-Dale-datasheet-41169523.pdf?src-supplier=element14+APAC, ComponentLink21Description=https://datasheet.octopart.com:443/CRCW040210K0FKEDHP-Vishay-datasheet-192322387.pdf?src-supplier=HQonline, ComponentLink21URL=https://datasheet.octopart.com:443/CRCW040210K0FKEDHP-Vishay-datasheet-192322387.pdf?src-supplier=HQonline, ComponentLink22Description=https://datasheet.octopart.com:443/CRCW040210K0FKEDHP-Vishay-datasheet-62316122.pdf?src-supplier=Future+Electronics, ComponentLink22URL=https://datasheet.octopart.com:443/CRCW040210K0FKEDHP-Vishay-datasheet-62316122.pdf?src-supplier=Future+Electronics, ComponentLink23Description=https://datasheet.octopart.com:443/CRCW040210K0FKEDHP-Vishay-Dale-datasheet-47688881.pdf?src-supplier=RS+(Formerly+Allied+Electronics), ComponentLink23URL=https://datasheet.octopart.com:443/CRCW040210K0FKEDHP-Vishay-Dale-datasheet-47688881.pdf?src-supplier=RS+(Formerly+Allied+Electronics), ComponentLink24Description=https://datasheet.octopart.com:443/CRCW040210K0FKEDHP-Vishay-datasheet-11548710.pdf?src-supplier=Arrow+Electronics, ComponentLink24URL=https://datasheet.octopart.com:443/CRCW040210K0FKEDHP-Vishay-datasheet-11548710.pdf?src-supplier=Arrow+Electronics, ComponentLink25Description=http://sigma.octopart.com:80/rohs_statement/Vishay-company-15.pdf?src-supplier=Compliance+Statements, ComponentLink25URL=http://sigma.octopart.com:80/rohs_statement/Vishay-company-15.pdf?src-supplier=Compliance+Statements, Composition="Thick Film", Contact Plating=Tin, Country of Origin="Israel, Mainland China", Depth=500µm, Export Control Classification Number (ECCN) Code=EAR99, Harmonized Tariff Schedule (HTS) Code=8533.21.00.30, Height=300µm, Introduction Date=2008-07-29, Lead Free="Lead Free", Length=1mm, Lifecycle Status=Production, Manufacturer Part Number=CRCW040210K0FKEDHP, Military Standard=Not, Mount="Surface Mount", Number of Pins=2, Number of Terminals=2, Packaging="Cut Tape", Pricing 1="1=0.12, 10=0.057, 25=0.0436, 50=0.0362, 100=0.0303, 250=0.02452, 500=0.02122, 1000=0.0186, 5000=0.01445 (USD)", Radiation Hardening=No, REACH SVHC=Yes, RoHS=Compliant, Schedule B=8533210045, Stock 1=168325, Supplier 1=DigiKey, Termination=SMD/SMT, Voltage Rating (DC)=50V, Weight=652.039032µg, Width=500µm, Working Voltage=50V
  R4 R5 R11 R12: Case/Package=0402
R6 R7: library part RCS04025K10FKED, "5.1kΩ SMD Chip Resistor, 5.1 kOhm, ± 1%, 200 mW, 0402 [1005 Metric], Thick Film, Anti-Surge", Case/Package=0402, Manufacturer=Vishay, Max Operating Temperature=155°C, Max Power Dissipation=200mW, Min Operating Temperature=-55°C, Ratings=AEC-Q200, Resistance=5.1kΩ, Supplier Part Number 1=541-RCS04025K10FKEDCT-ND, Temperature Coefficient=100ppm/°C, Tolerance=±1%, Working Voltage=50V, Category="Chip SMD Resistors", China RoHS=Non-Compliant, ComponentLink1Description=https://datasheet.octopart.com:443/RCS04025K10FKED-Vishay-datasheet-176436275.pdf?src-supplier=IHS, ComponentLink1URL=https://datasheet.octopart.com:443/RCS04025K10FKED-Vishay-datasheet-176436275.pdf?src-supplier=IHS, ComponentLink2Description=http://sigma.octopart.com:80/rohs_statement/Vishay-company-15.pdf?src-supplier=Compliance+Statements, ComponentLink2URL=http://sigma.octopart.com:80/rohs_statement/Vishay-company-15.pdf?src-supplier=Compliance+Statements, Composition="Thick Film", Country of Origin="Israel, Mainland China", Export Control Classification Number (ECCN) Code=EAR99, Features="Automotive AEC-Q200", Harmonized Tariff Schedule (HTS) Code=8533.21.00.30, Height=350µm, Introduction Date=2016-07-12, Length=1mm, Lifecycle Status=Production, Manufacturer Part Number=RCS04025K10FKED, Mount="Surface Mount", Number of Terminals=2, Number of Terminations=2, Power Rating=200mW, Pricing 1="1=0.12, 10=0.058, 25=0.0448, 50=0.0372, 100=0.0313, 250=0.02536, 500=0.02198, 1000=0.01929, 5000=0.01503 (USD)", REACH SVHC=Yes, RoHS=Compliant, Stock 1=18413, Supplier 1=DigiKey, Width=500µm
U1: "Microcontroller 32-Bit ARM Cortex-M4 RISC 32K-Byte Flash 3.3V 48-Pin LQFP", Case/Package=LFQFP, Frequency=170MHz, Manufacturer=STMicroelectronics, Max Frequency=48MHz, Max Operating Temperature=85°C, Max Supply Current=29mA, Max Supply Voltage=3.6V, Min Operating Temperature=-40°C, Min Supply Voltage=1.71V, Nominal Supply Voltage (DC)=3V, ADC Channels (Resolution)="17-Ch 12-Bit", Category=Microcontrollers, China RoHS=Compliant, ComponentLink1Description=https://datasheet.octopart.com:443/STM32G431C6T6-STMicroelectronics-datasheet-159144895.pdf?src-supplier=Newark, ComponentLink1URL=https://datasheet.octopart.com:443/STM32G431C6T6-STMicroelectronics-datasheet-159144895.pdf?src-supplier=Newark, ComponentLink2Description=https://datasheet.octopart.com:443/STM32G431C6T6-STMicroelectronics-datasheet-144618855.pdf?src-supplier=TME, ComponentLink2URL=https://datasheet.octopart.com:443/STM32G431C6T6-STMicroelectronics-datasheet-144618855.pdf?src-supplier=TME, Core Architecture="ARM Cortex-M4", Country of Origin="Mainland China, Taiwan", DAC Channels (Resolution)="4-Ch 12-Bit", EEPROM Memory Size=0B, Export Control Classification Number (ECCN) Code=3A991.A.2, Flash Memory Size=32kB, Harmonized Tariff Schedule (HTS) Code=8542.31.00.25, Height - Seated (Max)=1.6mm, Interface=USB, Introduction Date=2019-10-29, Length=7mm, Lifecycle Status=Production, Manufacturer Part Number=STM32G431C6T6, Memory Type=FLASH, Number of A/D Converters=2, Number of Channels=17, Number of D/A Converters=2, Number of I2C Channels=3, Number of I/Os=5, Number of Interrupts=16, Number of SPI Channels=3, Number of Terminals=48, Number of Timers/Counters=12, Number of USART Channels=3, Peripherals=POR, Pricing 1="1500=2.29 (USD)", RAM Size=32kB, REACH SVHC=Yes, RoHS=Compliant, Schedule B="8542310000, 8542310000|8542310000|8542310000|8542310000|8542310000", Stock 1=1500, Supplier 1="Future Electronics", Supplier Part Number 1=STM32G431C6T6, Terminal Pitch=500µm, Width=7mm
U2: "300mA ultra-low-noise low-IQ low-dropout (LDO) linear regulator with high PSRR 5-SOT-23 -40 to 125", Case/Package=SOT-23-5, Dropout Voltage=145mV, Manufacturer="Texas Instruments", Manufacturer Lifecycle Status=ACTIVE, Max Junction Temperature (Tj)=125°C, Max Supply Voltage=6V, Min Operating Temperature=-40°C, Min Supply Voltage=1.6V, Nominal Supply Current=6.5µA, Output Current=300mA, Output Voltage=3.3V, Supplier Part Number 1=296-TPS7A2033PDBVRDKR-ND, Accuracy=1.5%, Category="LDO Voltage Regulators", ComponentLink1Description=https://sigma.octopart.com:443/177332311/technical_drawing/Texas-Instruments-TPS7A2033PDBVR.pdf?src-supplier=Texas+Instruments, ComponentLink1URL=https://sigma.octopart.com:443/177332311/technical_drawing/Texas-Instruments-TPS7A2033PDBVR.pdf?src-supplier=Texas+Instruments, ComponentLink2Description=https://octopart.com:443/opatz8j6/c1?t=jI4MJxUHNHWPLUTUjPFE_I4nFT9ogQQS70wFg6iEODFO8LbYHvqBDKPBMlDtEwO4fNGI88ubVwCkCjf0m79oYyvw0lNgXSr_kQlB_nshs-lDL0gpQEt062WpfwVbrY7aMcaNfk_VYcVu1c5ZyMHT8tYLznoJcMs0V3cIKOpV8FkTUbmZxBhaArT7MSQXB5rB175PQ9HeqkODOBcAb5uxQ4pXmdIRVFW0nHjT5bbTxbLCkHYQ6wSbjOTmjpzrmMdRq376bhW5SzS0L0ZYTijf2l1mplZ7KrrI9CUmQvcyMNcVPe6befGlNnr1fDH3Q5Ss6aSm6FD-UpaqOnEuIpR4XaVo6xK0ksEziWk1rzqOuekfSo_fNioOtoDqTgyhaxobMR58zb0N&src-supplier=Texas+Instruments, ComponentLink2URL=https://octopart.com:443/opatz8j6/c1?t=jI4MJxUHNHWPLUTUjPFE_I4nFT9ogQQS70wFg6iEODFO8LbYHvqBDKPBMlDtEwO4fNGI88ubVwCkCjf0m79oYyvw0lNgXSr_kQlB_nshs-lDL0gpQEt062WpfwVbrY7aMcaNfk_VYcVu1c5ZyMHT8tYLznoJcMs0V3cIKOpV8FkTUbmZxBhaArT7MSQXB5rB175PQ9HeqkODOBcAb5uxQ4pXmdIRVFW0nHjT5bbTxbLCkHYQ6wSbjOTmjpzrmMdRq376bhW5SzS0L0ZYTijf2l1mplZ7KrrI9CUmQvcyMNcVPe6befGlNnr1fDH3Q5Ss6aSm6FD-UpaqOnEuIpR4XaVo6xK0ksEziWk1rzqOuekfSo_fNioOtoDqTgyhaxobMR58zb0N&src-supplier=Texas+Instruments, ComponentLink3Description=https://sigma.octopart.com:443/175570406/technical_drawing/Texas-Instruments-TPS7A2033PDBVR.pdf?src-supplier=Texas+Instruments, ComponentLink3URL=https://sigma.octopart.com:443/175570406/technical_drawing/Texas-Instruments-TPS7A2033PDBVR.pdf?src-supplier=Texas+Instruments, ComponentLink4Description=https://sigma.octopart.com:443/169406034/technical_drawing/Texas-Instruments-TPS7A2033PDBVR.pdf?src-supplier=Texas+Instruments, ComponentLink4URL=https://sigma.octopart.com:443/169406034/technical_drawing/Texas-Instruments-TPS7A2033PDBVR.pdf?src-supplier=Texas+Instruments, ComponentLink5Description=https://sigma.octopart.com:443/155939316/technical_drawing/Texas-Instruments-TPS7A2033PDBVR.pdf?src-supplier=Texas+Instruments, ComponentLink5URL=https://sigma.octopart.com:443/155939316/technical_drawing/Texas-Instruments-TPS7A2033PDBVR.pdf?src-supplier=Texas+Instruments, ComponentLink6Description=https://datasheet.octopart.com:443/TPS7A2033PDBVR-Texas-Instruments-datasheet-149070019.pdf?src-supplier=Upverter, ComponentLink6URL=https://datasheet.octopart.com:443/TPS7A2033PDBVR-Texas-Instruments-datasheet-149070019.pdf?src-supplier=Upverter, ComponentLink7Description=https://datasheet.octopart.com:443/TPS7A2033PDBVR-Texas-Instruments-datasheet-164420832.pdf?src-supplier=Augswan, ComponentLink7URL=https://datasheet.octopart.com:443/TPS7A2033PDBVR-Texas-Instruments-datasheet-164420832.pdf?src-supplier=Augswan, ComponentLink8Description=https://datasheet.octopart.com:443/TPS7A2033PDBVR-Texas-Instruments-datasheet-159781690.pdf?src-supplier=LCSC, ComponentLink8URL=https://datasheet.octopart.com:443/TPS7A2033PDBVR-Texas-Instruments-datasheet-159781690.pdf?src-supplier=LCSC, ComponentLink9Description=http://sigma.octopart.com:80/reach_statement/Texas-Instruments-company-64.pdf?src-supplier=Compliance+Statements, ComponentLink9URL=http://sigma.octopart.com:80/reach_statement/Texas-Instruments-company-64.pdf?src-supplier=Compliance+Statements, ComponentLink10Description=http://sigma.octopart.com:80/conflict_mineral_statement/Texas-Instruments-company-63.pdf?src-supplier=Compliance+Statements, ComponentLink10URL=http://sigma.octopart.com:80/conflict_mineral_statement/Texas-Instruments-company-63.pdf?src-supplier=Compliance+Statements, Height=1.45mm, Length=2.9mm, Lifecycle Status=Production, Manufacturer Part Number=TPS7A2033PDBVR, Max Operating Temperature=125°C, Number of Channels=1, Number of Outputs=1, Number of Pins=5, Pricing 1="1=0.33, 10=0.225, 25=0.1992, 100=0.1715, 250=0.15828, 500=0.15028, 1000=0.14369 (USD)", RoHS=Compliant, Stock 1=57995, Supplier 1=DigiKey, Thickness=1.2mm, Width=1.6mm
U3: "65-V max 3-A peak 3-phase motor driver with integrated FETs 36-VQFN -40 to 125", Manufacturer_Name="Texas Instruments", Copyright="Copyright (C) 2026 Ultra Librarian. All rights reserved.", Manufacturer_Part_Number=DRV8313RHHR, RefDes=RefDes, TYPE=TYPE
Y1: library part "TSX-3225 24.0000MF15X-AC3", "Crystal 24MHz ±10ppm (Tol) ±15ppm (Stability) 9pF FUND 40Ohm 4-Pin Mini-CSMD T/R", Case/Package=SMD/SMT, ESR (Equivalent Series Resistance)=40Ω, Frequency=24MHz, Frequency Stability=15ppm, Frequency Tolerance=0.001%, Load Capacitance=9pF, Manufacturer=Epson, Max Operating Temperature=85°C, Min Operating Temperature=-40°C, Category=Crystals, China RoHS=Compliant, ComponentLink1Description=https://datasheet.octopart.com:443/TSX-3225-24.0000MF15X-AC3-Epson-datasheet-61114919.pdf?src-supplier=ODG+(Origin+Data+Global), ComponentLink1URL=https://datasheet.octopart.com:443/TSX-3225-24.0000MF15X-AC3-Epson-datasheet-61114919.pdf?src-supplier=ODG+(Origin+Data+Global), ComponentLink2Description=https://datasheet.octopart.com:443/TSX-322524.0000MF15X-AC3-Epson-datasheet-180707711.pdf?src-supplier=IHS, ComponentLink2URL=https://datasheet.octopart.com:443/TSX-322524.0000MF15X-AC3-Epson-datasheet-180707711.pdf?src-supplier=IHS, ComponentLink3Description=https://datasheet.octopart.com:443/TSX-3225-24.0000MF15X-AC3-Epson-datasheet-141944207.pdf?src-supplier=Arrow.cn, ComponentLink3URL=https://datasheet.octopart.com:443/TSX-3225-24.0000MF15X-AC3-Epson-datasheet-141944207.pdf?src-supplier=Arrow.cn, ComponentLink4Description=http://sigma.octopart.com:80/149135495/reach_statement/Epson-TSX-3225-24.0000MF15X-AC3.pdf?src-supplier=Compliance+Statements, ComponentLink4URL=http://sigma.octopart.com:80/149135495/reach_statement/Epson-TSX-3225-24.0000MF15X-AC3.pdf?src-supplier=Compliance+Statements, ComponentLink5Description=http://sigma.octopart.com:80/149135496/rohs_statement/Epson-TSX-3225-24.0000MF15X-AC3.pdf?src-supplier=Compliance+Statements, ComponentLink5URL=http://sigma.octopart.com:80/149135496/rohs_statement/Epson-TSX-3225-24.0000MF15X-AC3.pdf?src-supplier=Compliance+Statements, Height=609.6µm, Lead Free="Lead Free", Length=3.2004mm, Lifecycle Status=Production, Manufacturer Part Number="TSX-3225 24.0000MF15X-AC3", Mount="Surface Mount", Pricing 1="1=0.82, 10=0.714, 25=0.6748, 50=0.647, 100=0.6202 (USD)", REACH SVHC=Yes, RoHS=Compliant, Schedule B="8541600060, 8541600060|8541600060|8541600060|8541600060|8541600060", Series Resistance=40Ω, Stock 1=44842, Supplier 1=DigiKey, Termination=SMD/SMT, Tolerance=0.001%, Weight=15.989131mg, Width=2.4892mm

## Free pads (board coordinates)
  round 6 hole 3.2 mask+0.051: 1(-13.43,-13.43) 2(13.43,-13.43) 3(13.43,13.43) 4(-13.43,13.43)

## Via types
v1: diameter 0.45, hole 0.2, L1 (SIG) to L4 (SIG + PWR), tented both sides, 297 vias

## Nets (pads, with @x,y where several pads share a name; then routed paths per layer and width w, separated by ;. In a path a pad name is that pad's centre, name@x,y a point inside that pad or via, vN(x,y) a via of type N, cw(c..) or ccw(c..) an arc to the next point about the centre after c; other vN are vias at no path point)
+3V3: 3V3.1@6.7,-11 BOOT0.3 BOOT0.4 C3.2 C4.2 C5.2 C6.2 C7.2 C10.2 C14.2 C24.1 MT6835.9 R4.2 R9.1 R12.1 R13.1 U1.1 U1.20 U1.21 U1.24 U1.36 U1.48 U2.5 | length 31.7